# Altium PCB video.altium-saved.PcbDoc (part 1 of 5)
Units mil, origin at the board's own origin, x right, y up, seen from the top; angles counter-clockwise.
Board outline 12285 x 4200 mil, 4 copper layers (top_copper, Mid-Layer 1, Mid-Layer 2, Bottom Layer), stack 68.6 mil thick; 189 components, 588 nets, 2118 pads, 808 vias.
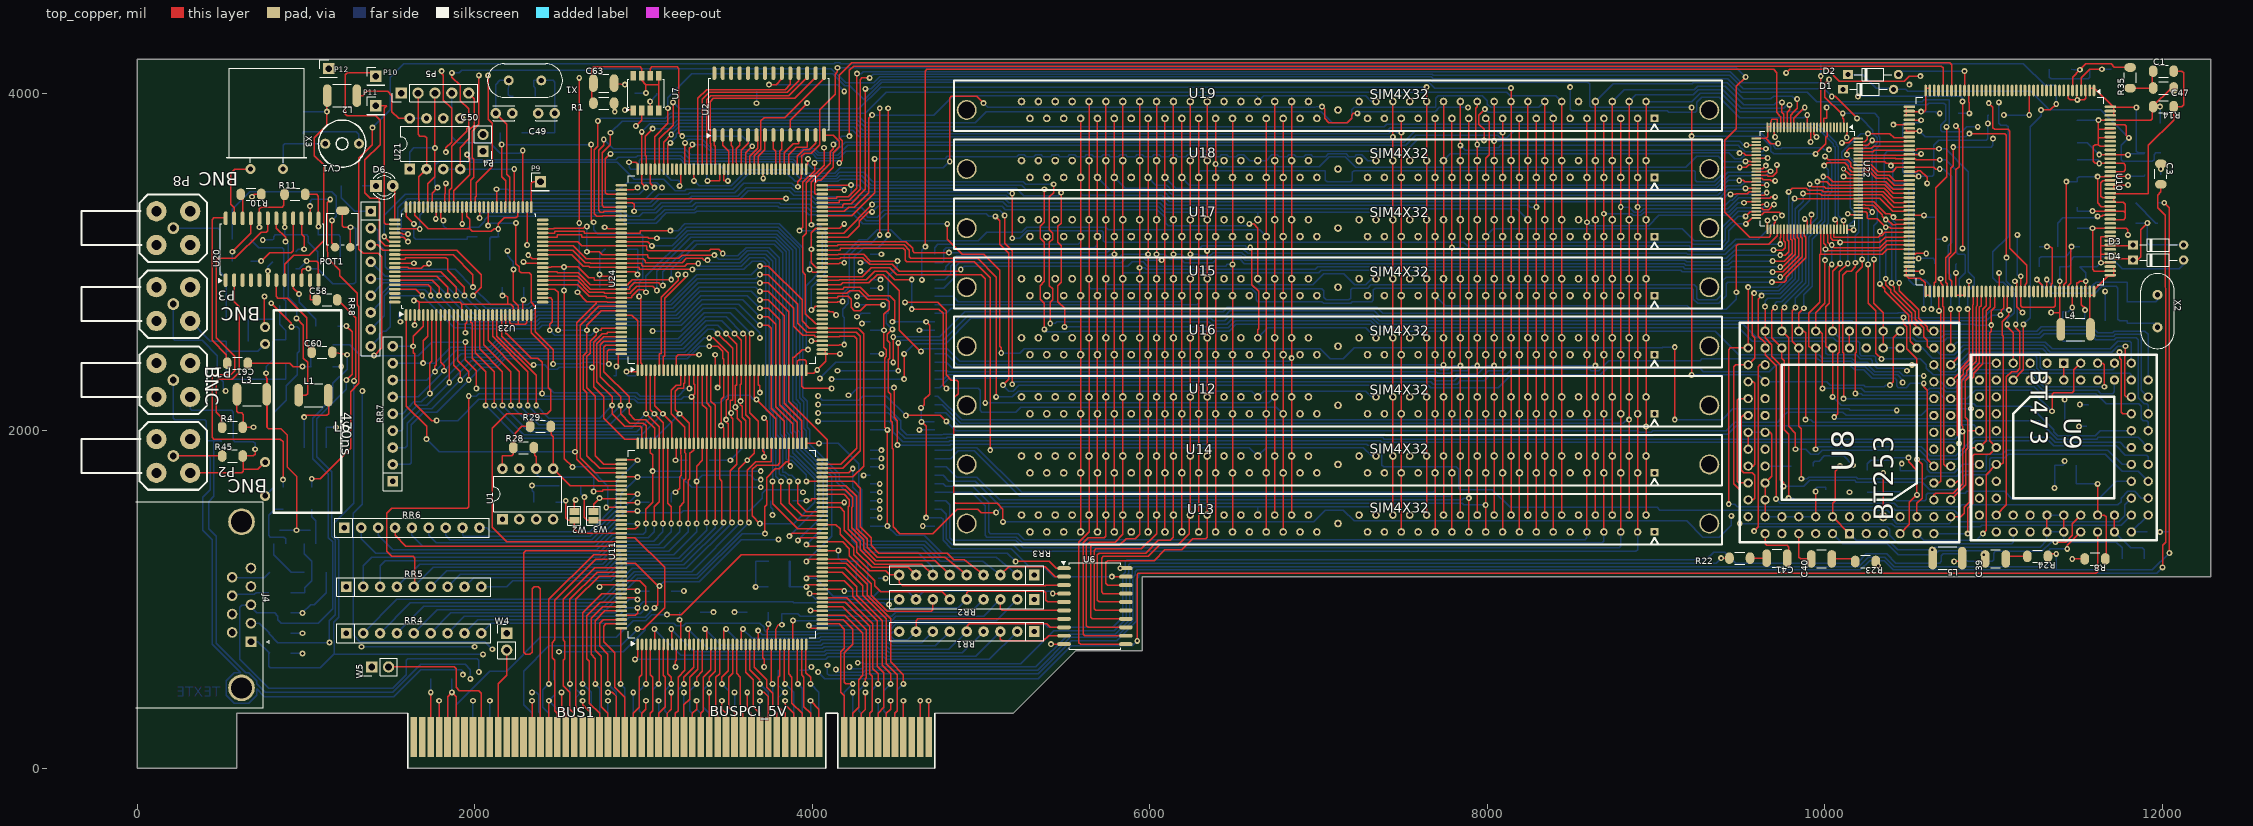
[diagram p0: top_copper view]
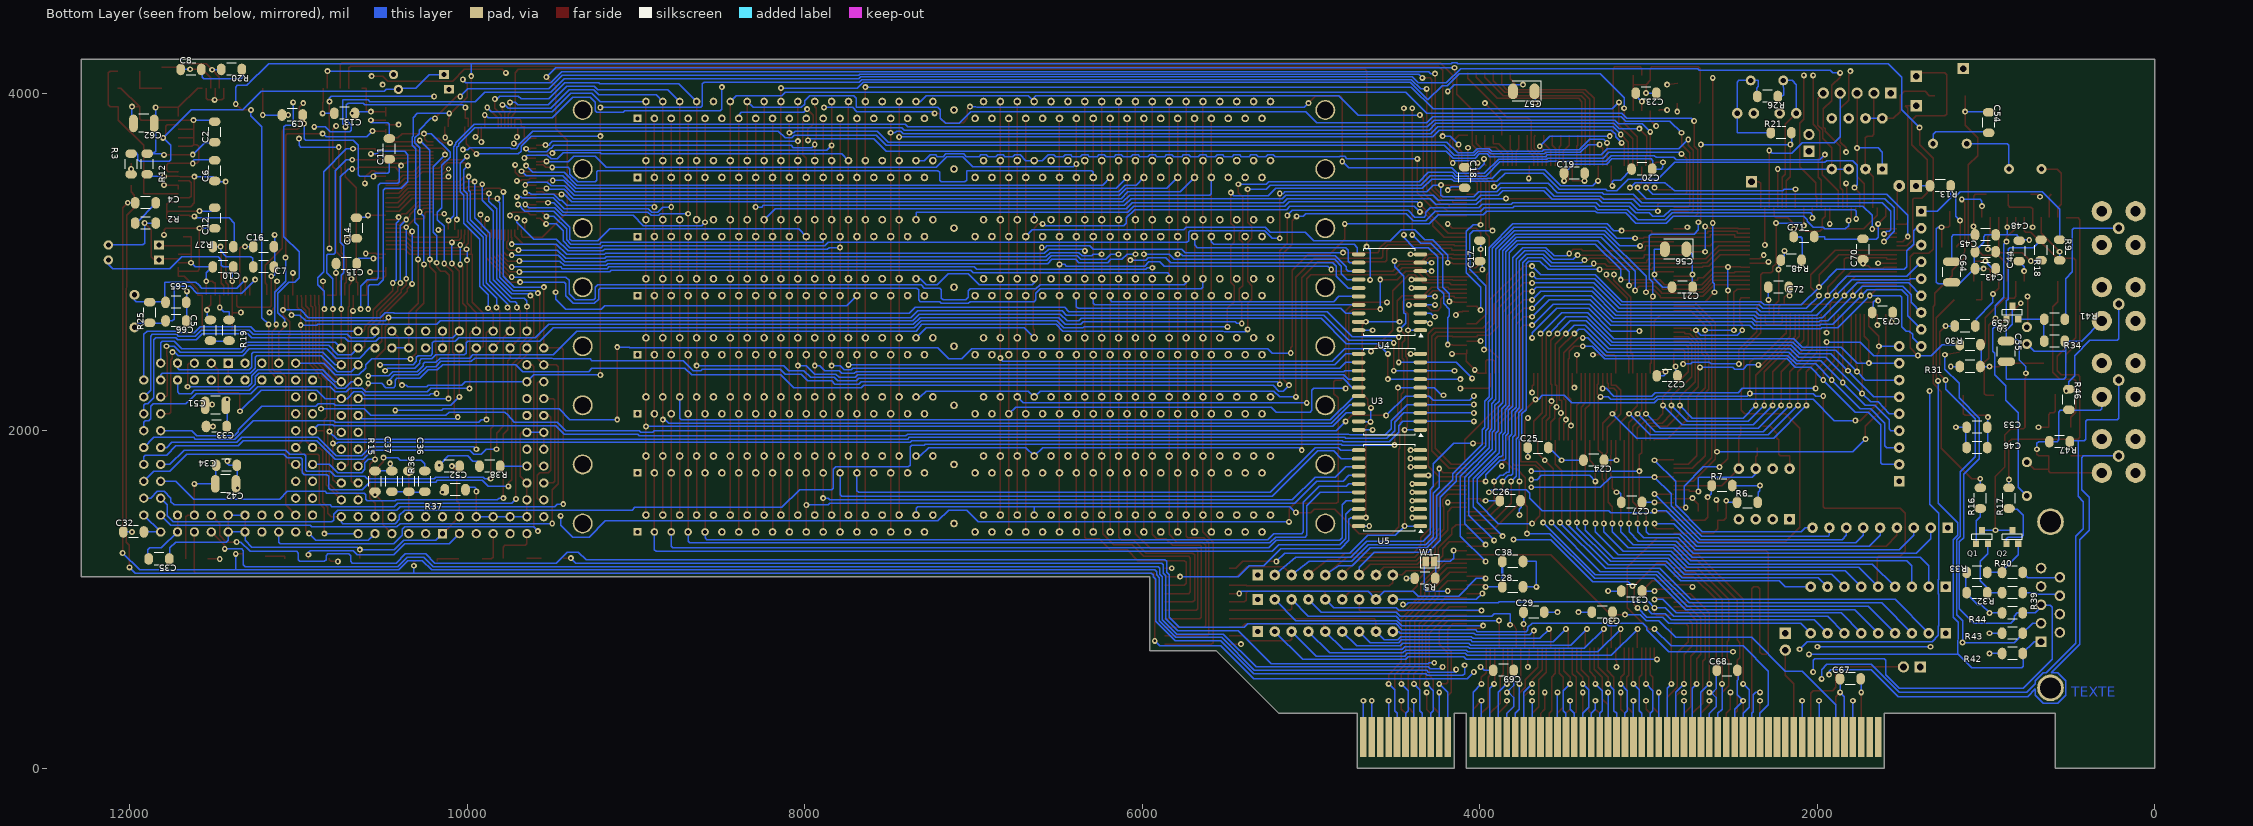
[diagram p1: Bottom Layer view, seen from below]
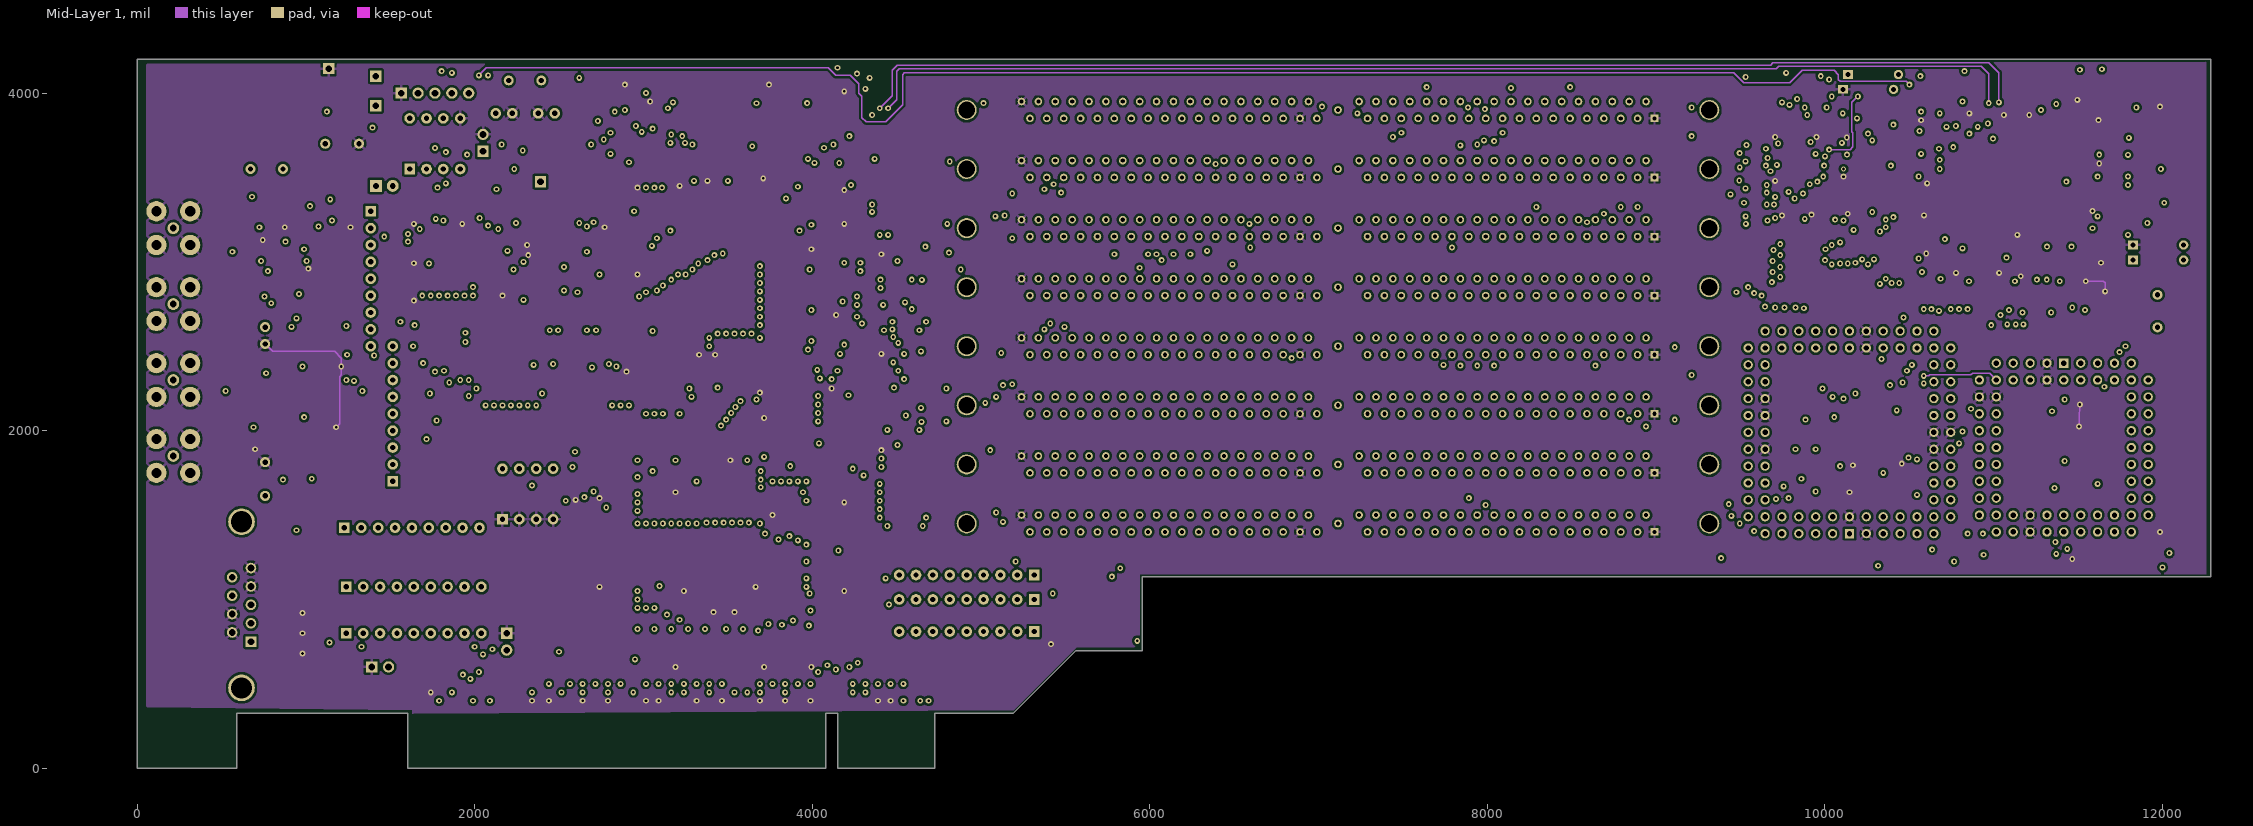
[diagram p2: Mid-Layer 1]
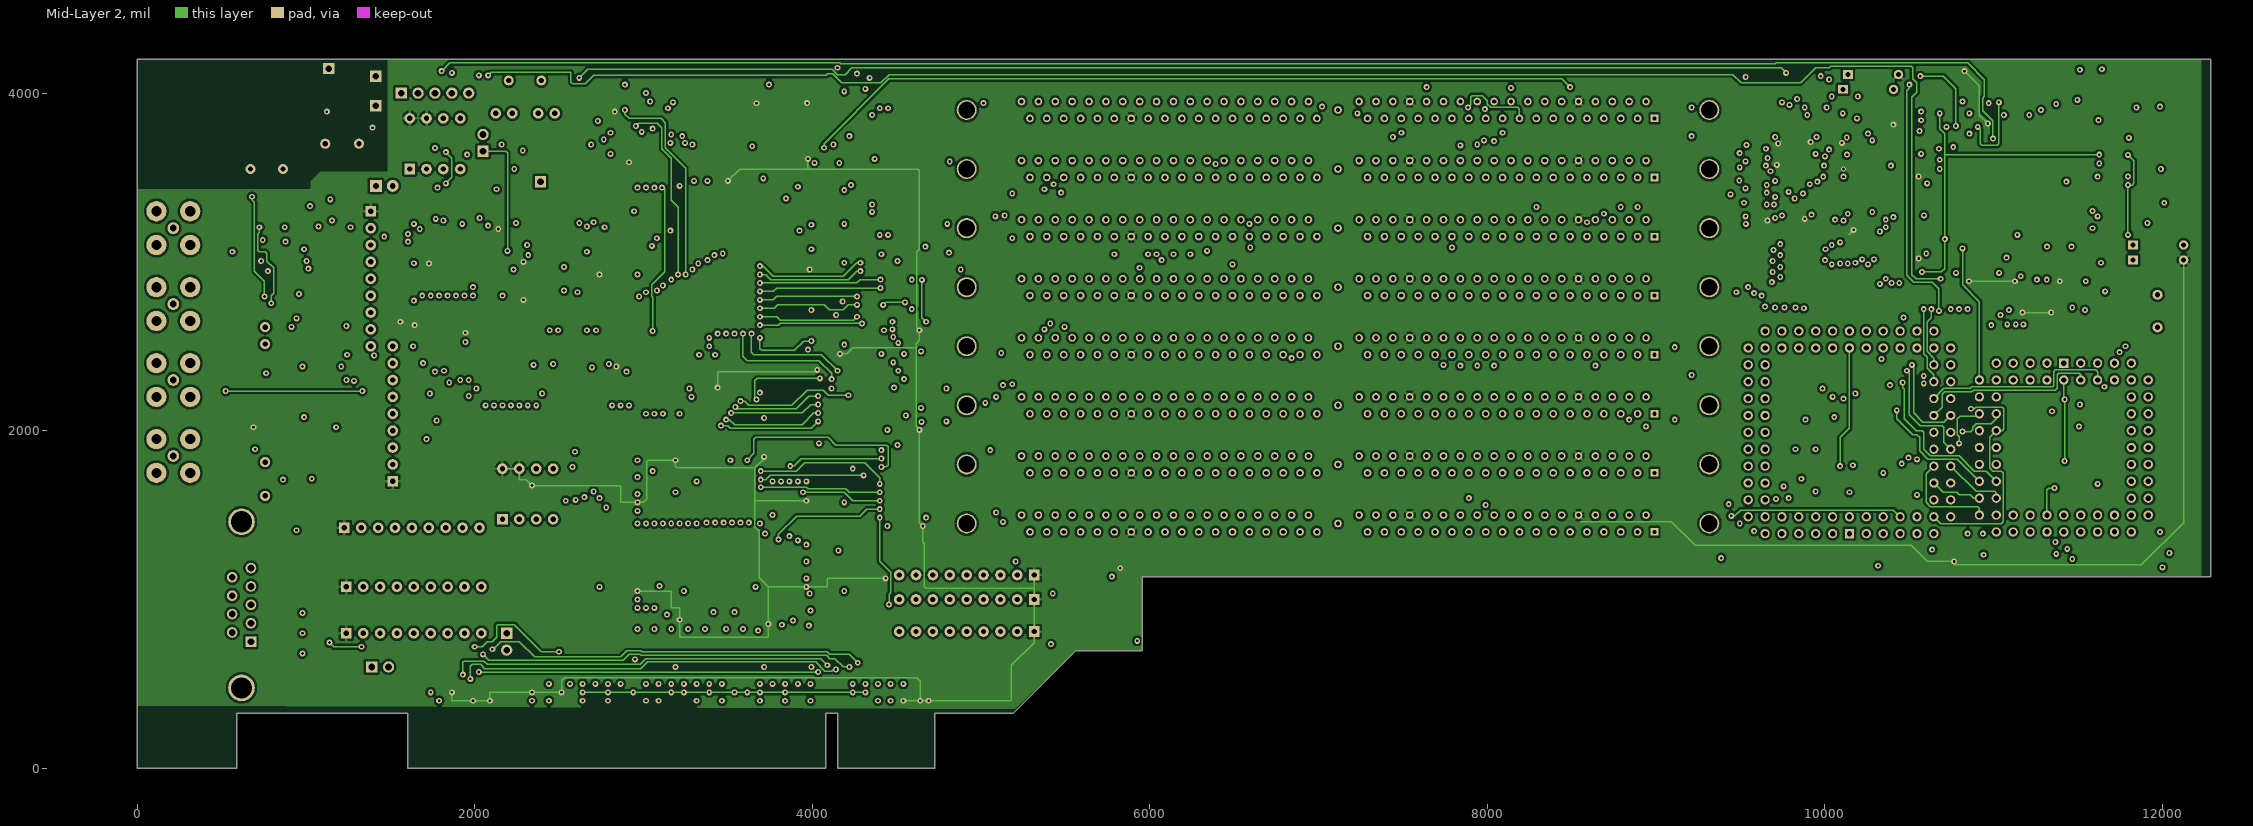
[diagram p3: Mid-Layer 2]

## Layer stack, top to bottom
Top Solder: solder mask 0.4, Solder Resist, Dk 3.5
top_copper: signal copper 1.4
Dielectric 1: core 21, FR-4, Dk 4.5
Mid-Layer 1: signal copper 1.4
Dielectric 2: prepreg 21, FR-4, Dk 4.5
Mid-Layer 2: signal copper 1.4
Dielectric 3: core 21, FR-4, Dk 4.5
Bottom Layer: signal copper 1.4
Bottom Solder: solder mask 0.4, Solder Resist, Dk 3.5

## Board outline
9345,1135 12085,1135 12285,1135 12285,4200 6715,4200 0,4200 0,0 590,0 590,325 1605,325 1605,0 4080,0 4080,325 4150,325 4150,0 4725,0 4725,325 5190,325 5560,695 5955,695 5955,1135 6395,1135

## Design rules (kind name [scope] priority, off if disabled: settings)
BoardOutlineClearance [All] p1: gap=0.39 ignorepadtopadclearanceinfootprint=FALSE
Clearance Clearance_pwr [InNetClass('pwr')] p1: gap=7.87 ignorepadtopadclearanceinfootprint=FALSE
Clearance "Clearance_Polygon 0" [InNamedPolygon('Polygon 0')] p2: gap=15.75 ignorepadtopadclearanceinfootprint=FALSE
Clearance "Clearance_Polygon 1" [InNamedPolygon('Polygon 1')] p3: gap=15.75 ignorepadtopadclearanceinfootprint=FALSE
Clearance [All] p4: gap=7.87 ignorepadtopadclearanceinfootprint=FALSE
DiffPairsRouting [All] p1: maxlimit=9.84 minlimit=9.84 mostfreqgap=9.84 toplayer_minwidth=15 toplayer_maxwidth=15 toplayer_prefwidth=7.87 midlayer1_minwidth=15 midlayer1_maxwidth=15 midlayer1_prefwidth=15 midlayer2_minwidth=15 midlayer2_maxwidth=15 midlayer2_prefwidth=15 bottomlayer_minwidth=15 bottomlayer_maxwidth=15 bottomlayer_prefwidth=15 maxuncoupledlength=500
HoleSize [All] p1: absolutevalues=TRUE maxlimit=125.98 minlimit=15.75 maxpercent=80.000 minpercent=20.000
HoleToHoleClearance [All] p1: gap=9.84 allowstackedmicrovias=FALSE
MinimumAnnularRing [All] p1: minimumring=1.97
PolygonConnect "PolygonConnect_Polygon 0" [InNamedPolygon('Polygon 0')] p1: connectstyle=Relief reliefconductorwidth=11.81 reliefentries=4 polygonreliefangle="90 Angle" airgapwidth=15.75
PolygonConnect "PolygonConnect_Polygon 1" [InNamedPolygon('Polygon 1')] p2: connectstyle=Relief reliefconductorwidth=11.81 reliefentries=4 polygonreliefangle="90 Angle" airgapwidth=15.75
PolygonConnect [All] p3: connectstyle=Relief reliefconductorwidth=19.68 reliefentries=4 polygonreliefangle="90 Angle" airgapwidth=19.68
RoutingVias RoutingVias_pwr [InNetClass('pwr')] p1: holewidth=15.75 width=31.5 viastyle="Through Hole" minholewidth=15.75 minwidth=31.5 maxholewidth=15.75 maxwidth=35
RoutingVias [All] p2: holewidth=15.75 width=35 viastyle="Through Hole" minholewidth=15.75 minwidth=31.5 maxholewidth=15.75 maxwidth=35
SilkToSilkClearance [All] p1: silktosilkclearance=0
SolderMaskExpansion [All] p1: expansion=0 istentingtop=FALSE
Width Width_pwr [InNetClass('pwr')] p1: maxlimit=10 minlimit=7.87 preferedwidth=9.84
Width [All] p2: maxlimit=10 minlimit=7.87 preferedwidth=7.87
26 further rules are at their usual default settings.

## Classes and differential pairs
net class pwr: +3.3V +5F

## Components (designator, comment, footprint, x,y, rotation, side; value= is the part's Value field where it differs from the comment)
BUS1 "BUSPCI_5V" BUSPCI 4115,175 r0 top locked
C1 "100nF" R_1206_3216Metric_Pad1.30x1.75mm_HandSolder 12005,4130 r0 top
C2 "100nF" R_1206_3216Metric_Pad1.30x1.75mm_HandSolder 11495,3770 r90 bottom
C3 "100nF" R_1206_3216Metric_Pad1.30x1.75mm_HandSolder 11990,3520 r270 top
C4 "100nF" R_1206_3216Metric_Pad1.30x1.75mm_HandSolder 11905,3350 r0 bottom
C5 "100nF" R_1206_3216Metric_Pad1.30x1.75mm_HandSolder 11520,2595 r270 bottom
C6 "100nF" R_1206_3216Metric_Pad1.30x1.75mm_HandSolder 11495,3540 r90 bottom
C7 "100nF" R_1206_3216Metric_Pad1.30x1.75mm_HandSolder 11205,2970 r180 bottom
C8 "100nF" R_1206_3216Metric_Pad1.30x1.75mm_HandSolder 11635,4140 r180 bottom
C9 "100nF" R_1206_3216Metric_Pad1.30x1.75mm_HandSolder 11035,3870 r0 bottom
C10 "100nF" R_1206_3216Metric_Pad1.30x1.75mm_HandSolder 11445,2970 r0 bottom
C11 "100nF" R_1206_3216Metric_Pad1.30x1.75mm_HandSolder 10460,3670 r90 bottom
C12 "100nF" R_1206_3216Metric_Pad1.30x1.75mm_HandSolder 11495,3260 r90 bottom
C13 "100nF" R_1206_3216Metric_Pad1.30x1.75mm_HandSolder 10725,3880 r0 bottom
C14 "100nF" R_1206_3216Metric_Pad1.30x1.75mm_HandSolder 10655,3200 r90 bottom
C15 "100nF" R_1206_3216Metric_Pad1.30x1.75mm_HandSolder 10715,2990 r0 bottom
C16 "100nF" R_1206_3216Metric_Pad1.30x1.75mm_HandSolder 11205,3090 r180 bottom
C17 "100nF" R_1206_3216Metric_Pad1.30x1.75mm_HandSolder 4000,3065 r90 bottom
C18 "100nF" R_1206_3216Metric_Pad1.30x1.75mm_HandSolder 4090,3500 r270 bottom
C19 "100nF" R_1206_3216Metric_Pad1.30x1.75mm_HandSolder 3440,3525 r180 bottom
C20 "100nF" R_1206_3216Metric_Pad1.30x1.75mm_HandSolder 3040,3550 r0 bottom
C21 "100nF" R_1206_3216Metric_Pad1.30x1.75mm_HandSolder 2800,2850 r0 bottom
C22 "100nF" R_1206_3216Metric_Pad1.30x1.75mm_HandSolder 2890,2325 r0 bottom
C23 "100nF" R_1206_3216Metric_Pad1.30x1.75mm_HandSolder 3015,4000 r0 bottom
C24 "100nF" R_1206_3216Metric_Pad1.30x1.75mm_HandSolder 3325,1825 r0 bottom
C25 "100nF" R_1206_3216Metric_Pad1.30x1.75mm_HandSolder 3655,1900 r180 bottom
C26 "100nF" R_1206_3216Metric_Pad1.30x1.75mm_HandSolder 3820,1585 r180 bottom
C27 "100nF" R_1206_3216Metric_Pad1.30x1.75mm_HandSolder 3100,1575 r0 bottom
C28 "100nF" R_1206_3216Metric_Pad1.30x1.75mm_HandSolder 3805,1075 r180 bottom
C29 "100nF" R_1206_3216Metric_Pad1.30x1.75mm_HandSolder 3680,925 r180 bottom
C30 "100nF" R_1206_3216Metric_Pad1.30x1.75mm_HandSolder 3275,925 r0 bottom
C31 "100nF" R_1206_3216Metric_Pad1.30x1.75mm_HandSolder 3100,1050 r0 bottom
C32 "100nF" R_1206_3216Metric_Pad1.30x1.75mm_HandSolder 11975,1400 r180 bottom
C33 "100nF" R_1206_3216Metric_Pad1.30x1.75mm_HandSolder 11485,2025 r0 bottom
C34 "100nF" R_1206_3216Metric_Pad1.30x1.75mm_HandSolder 11425,1795 r0 bottom
C35 "100nF" R_1206_3216Metric_Pad1.30x1.75mm_HandSolder 11825,1240 r0 bottom
C36 "100nF" R_1206_3216Metric_Pad1.30x1.75mm_HandSolder 10250,1700 r270 bottom
C37 "100pF" R_1206_3216Metric_Pad1.30x1.75mm_HandSolder 10445.12,1700 r270 bottom
C38 "4,7uF" R_1206_3216Metric_Pad1.30x1.75mm_HandSolder 3805,1225 r180 bottom
C39 "1uF" R_1210_3225Metric_Pad1.30x2.65mm_HandSolder 11010,1240 r0 top
C40 "1uF" R_1210_3225Metric_Pad1.30x2.65mm_HandSolder 9980,1240 r0 top
C41 "1uF" R_1210_3225Metric_Pad1.30x2.65mm_HandSolder 9715,1245 r180 top
C42 "2.2uF" R_1210_3225Metric_Pad1.30x2.65mm_HandSolder 11430,1685 r0 bottom
C43 "220nF" R_1206_3216Metric_Pad1.30x1.75mm_HandSolder 1005,2960 r0 bottom
C44 "220nF" R_1206_3216Metric_Pad1.30x1.75mm_HandSolder 805,3065 r90 bottom
C45 "220nF" R_1206_3216Metric_Pad1.30x1.75mm_HandSolder 1005,3060 r0 bottom
C46 "220pF" R_1206_3216Metric_Pad1.30x1.75mm_HandSolder 1055,1900 r0 bottom
C47 "220pF" R_1206_3216Metric_Pad1.30x1.75mm_HandSolder 12005,4030 r0 top
C48 "22nF" R_1206_3216Metric_Pad1.30x1.75mm_HandSolder 1005,3160 r0 bottom
C49 "22pF" C_Disc_D3.0mm_W2.0mm_P2.50mm 2475,3880 r180 top
C50 "22pF" C_Disc_D3.0mm_W2.0mm_P2.50mm 2125,3880 r0 top
C51 "22uF" R_1210_3225Metric_Pad1.30x2.65mm_HandSolder 11490,2150 r0 bottom
C52 "22uF" R_1206_3216Metric_Pad1.30x1.75mm_HandSolder 10105,1790 r0 bottom
C53 "330pF" R_1206_3216Metric_Pad1.30x1.75mm_HandSolder 1055,2020 r0 bottom
C54 "4.7uF" R_1206_3216Metric_Pad1.30x1.75mm_HandSolder 985,3825 r270 bottom
C55 "4.7uF" R_1210_3225Metric_Pad1.30x2.65mm_HandSolder 880,2470 r270 bottom
C56 "4.7uF" CP_EIA-3528-21_Kemet-B_Pad1.50x2.35mm_HandSolder 2840,3075 r0 bottom
C57 "4.7uF" CP_EIA-3528-21_Kemet-B_Pad1.50x2.35mm_HandSolder 3740,4010 r0 bottom
C58 "47nF" R_1206_3216Metric_Pad1.30x1.75mm_HandSolder 1125,2775 r0 top
C59 "47nF" R_1206_3216Metric_Pad1.30x1.75mm_HandSolder 1125,2620 r0 bottom
C60 "47nF" R_1206_3216Metric_Pad1.30x1.75mm_HandSolder 1095.98,2464 r0 top
C61 "47nF" R_1206_3216Metric_Pad1.30x1.75mm_HandSolder 595,2400 r180 top
C62 "47uF" R_1210_3225Metric_Pad1.30x2.65mm_HandSolder 11915,3820 r0 bottom
C63 "47uF" R_1210_3225Metric_Pad1.30x2.65mm_HandSolder 2765,4059.15 r0 top
C64 "6,8uF" R_1210_3225Metric_Pad1.30x2.65mm_HandSolder 1205,2940 r270 bottom
C65 "22pF" R_1206_3216Metric_Pad1.30x1.75mm_HandSolder 11725,2760 r0 bottom
C66 "22pF" R_1206_3216Metric_Pad1.30x1.75mm_HandSolder 11725,2650 r0 bottom
C67 "4,7uF" R_1206_3216Metric_Pad1.30x1.75mm_HandSolder 1805,530 r180 bottom
C68 "4,7uF" R_1206_3216Metric_Pad1.30x1.75mm_HandSolder 2535,580 r180 bottom
C69 "4,7uF" R_1206_3216Metric_Pad1.30x1.75mm_HandSolder 3860,580 r0 bottom
C70 "100nF" R_1206_3216Metric_Pad1.30x1.75mm_HandSolder 1730,3075 r90 bottom
C71 "100nF" R_1206_3216Metric_Pad1.30x1.75mm_HandSolder 2080,3150 r180 bottom
C72 "100nF" R_1206_3216Metric_Pad1.30x1.75mm_HandSolder 2230,2850 r180 bottom
C73 "100nF" R_1206_3216Metric_Pad1.30x1.75mm_HandSolder 1615,2700 r0 bottom
CV1 "5/30pF" CV3-30PF 1215,3700 r180 top
D1 "BAT46" D_DO-34_SOD68_P7.62mm_Horizontal 10106.54,4021.88 r0 top
D2 "BAT46" D_DO-34_SOD68_P7.62mm_Horizontal 10135,4110 r0 top
D3 "BAT46" D_DO-34_SOD68_P7.62mm_Horizontal 11825,3100 r0 top
D4 "BAT46" D_DO-34_SOD68_P7.62mm_Horizontal 11825,3010.86 r0 top
D6 "LED" LED_D3.0mm 1415,3450 r0 top
J4 "DB9FEM" DSUB-9_Female_Horizontal_P2.77x2.84mm_EdgePinOffset14.56mm_Housed_MountingHolesOffset15.98mm 675,750 r270 top locked
L1 "2,2uH" R_1812_4532Metric_Pad1.30x3.40mm_HandSolder 1045,2210 r0 top
L2 "22uH" R_1812_4532Metric_Pad1.30x3.40mm_HandSolder 1215,3985 r180 top
L3 "22uH" R_1812_4532Metric_Pad1.30x3.40mm_HandSolder 680,2215 r0 top
L4 "22uF" R_1812_4532Metric_Pad1.30x3.40mm_HandSolder 11485,2600 r0 top
L5 "22uH" R_1812_4532Metric_Pad1.30x3.40mm_HandSolder 10725,1245 r180 top
L6 "470ns" LRTDK 759.05,2113.74 r270 top
P1 "BNC" subclick 215,2300 r180 top locked
P2 "BNC" subclick 215,1850 r180 top locked
P3 "BNC" subclick 215,2750 r180 top locked
P4 "CONN_2" PinHeader_1x02_P2.54mm_Vertical 2050,3655 r180 top
P5 "CONN_5" PinHeader_1x05_P2.54mm_Vertical 1565,4000 r90 top
P8 "BNC" subclick 215,3200 r180 top locked
P9 "CONN_1" PinHeader_1x01_P2.54mm_Vertical 2390,3475 r0 top
P10 "CONN_1" PinHeader_1x01_P2.54mm_Vertical 1415,4100 r0 top
P11 "CONN_1" PinHeader_1x01_P2.54mm_Vertical 1415,3925 r0 top
P12 "CONN_1" PinHeader_1x01_P2.54mm_Vertical 1135,4145 r0 top
POT1 "100K" Potentiometer_Bourns_3314G_Vertical 1218.34,3195 r180 top
Q1 "BC848" SOT23EBC 1025,1370 r0 bottom
Q2 "BC848" SOT23EBC 845,1370 r0 bottom
Q3 "BC848" SOT23EBC 845,2700 r0 bottom
R1 "10" R_1206_3216Metric_Pad1.30x1.75mm_HandSolder 2765,3940 r0 top
R2 "100" R_1206_3216Metric_Pad1.30x1.75mm_HandSolder 11905,3230 r0 bottom
R3 "100" R_1206_3216Metric_Pad1.30x1.75mm_HandSolder 11990,3580 r270 bottom
R4 "10K" R_1206_3216Metric_Pad1.30x1.75mm_HandSolder 565,2020 r0 top
R5 "10K" R_1206_3216Metric_Pad1.30x1.75mm_HandSolder 4325,1125 r0 bottom
R6 "10K" R_1206_3216Metric_Pad1.30x1.75mm_HandSolder 2415,1575 r180 bottom
R7 "10K" R_1206_3216Metric_Pad1.30x1.75mm_HandSolder 2565,1675 r180 bottom
R8 "150" R_1206_3216Metric_Pad1.30x1.75mm_HandSolder 11600,1240 r180 top
R9 "150K" R_1206_3216Metric_Pad1.30x1.75mm_HandSolder 565,3070 r270 bottom
R10 "1K" R_1206_3216Metric_Pad1.30x1.75mm_HandSolder 675,3400 r180 top
R11 "1K" R_1206_3216Metric_Pad1.30x1.75mm_HandSolder 935,3400 r0 top
R12 "1K" R_1206_3216Metric_Pad1.30x1.75mm_HandSolder 11895,3580 r90 bottom
R13 "1K" R_1206_3216Metric_Pad1.30x1.75mm_HandSolder 1271.7,3450.94 r0 bottom
R14 "1M" R_1206_3216Metric_Pad1.30x1.75mm_HandSolder 12005,3920 r180 top
R15 "1M" R_1206_3216Metric_Pad1.30x1.75mm_HandSolder 10545,1700 r270 bottom
R16 "220" R_1206_3216Metric_Pad1.30x1.75mm_HandSolder 1035,1600 r90 bottom
R17 "220" R_1206_3216Metric_Pad1.30x1.75mm_HandSolder 865,1600 r90 bottom
R18 "220" R_1206_3216Metric_Pad1.30x1.75mm_HandSolder 675,3070 r270 bottom
R19 "220" R_1206_3216Metric_Pad1.30x1.75mm_HandSolder 11410,2595 r90 bottom
R20 "220" R_1206_3216Metric_Pad1.30x1.75mm_HandSolder 11395,4140 r0 bottom
R21 "220" R_1206_3216Metric_Pad1.30x1.75mm_HandSolder 2215,3765 r180 bottom
R22 "220" R_1206_3216Metric_Pad1.30x1.75mm_HandSolder 9495,1245 r0 top
R23 "220" R_1206_3216Metric_Pad1.30x1.75mm_HandSolder 10240,1225 r180 top
R24 "220" R_1206_3216Metric_Pad1.30x1.75mm_HandSolder 11260,1255 r180 top
R25 "220K" R_1206_3216Metric_Pad1.30x1.75mm_HandSolder 11880,2700 r90 bottom
R26 "220K" R_1206_3216Metric_Pad1.30x1.75mm_HandSolder 2295,3980 r0 bottom
R27 "27K" R_1206_3216Metric_Pad1.30x1.75mm_HandSolder 11445,3090 r0 bottom
R28 "2,2K" R_1206_3216Metric_Pad1.30x1.75mm_HandSolder 2290,1900 r0 top
R29 "2,2K" R_1206_3216Metric_Pad1.30x1.75mm_HandSolder 2390,2025 r0 top
R30 "3,3K" R_1206_3216Metric_Pad1.30x1.75mm_HandSolder 1095,2510 r0 bottom
R31 "470" R_1206_3216Metric_Pad1.30x1.75mm_HandSolder 1095,2380 r180 bottom
R32 "470" R_1206_3216Metric_Pad1.30x1.75mm_HandSolder 1055,1040 r0 bottom
R33 "470" R_1206_3216Metric_Pad1.30x1.75mm_HandSolder 1055,1160 r0 bottom
R34 "470" R_1206_3216Metric_Pad1.30x1.75mm_HandSolder 595,2530 r180 bottom
R35 "470" R_1206_3216Metric_Pad1.30x1.75mm_HandSolder 11807.32,4090.65 r90 top
R36 "470" R_1206_3216Metric_Pad1.30x1.75mm_HandSolder 10345,1700 r90 bottom
R37 "510" R_1206_3216Metric_Pad1.30x1.75mm_HandSolder 10070,1650 r180 bottom
R38 "510" R_1206_3216Metric_Pad1.30x1.75mm_HandSolder 9865,1790 r0 bottom
R39 "68" R_1206_3216Metric_Pad1.30x1.75mm_HandSolder 845,1040 r0 bottom
R40 "68" R_1206_3216Metric_Pad1.30x1.75mm_HandSolder 845,1160 r180 bottom
R41 "68" R_1206_3216Metric_Pad1.30x1.75mm_HandSolder 595,2660 r0 bottom
R42 "75" R_1206_3216Metric_Pad1.30x1.75mm_HandSolder 845,680 r180 bottom
R43 "75" R_1206_3216Metric_Pad1.30x1.75mm_HandSolder 845,800 r180 bottom
R44 "75" R_1206_3216Metric_Pad1.30x1.75mm_HandSolder 845,920 r180 bottom
R45 "75" R_1206_3216Metric_Pad1.30x1.75mm_HandSolder 565,1850 r0 top
R46 "75" R_1206_3216Metric_Pad1.30x1.75mm_HandSolder 510,2185 r270 bottom
R47 "75" R_1206_3216Metric_Pad1.30x1.75mm_HandSolder 565,1935 r0 bottom
R48 "10K" R_1206_3216Metric_Pad1.30x1.75mm_HandSolder 2155,3010 r0 bottom
RR1 "8x10K" R_Array_SIP9 5315,810 r180 top
RR2 "8x10K" R_Array_SIP9 5315,1000 r180 top
RR3 "8x10K" R_Array_SIP9 5315,1145 r180 top
RR4 "8x10K" R_Array_SIP9 1240,800 r0 top
RR5 "8x10K" R_Array_SIP9 1240,1075 r0 top
RR6 "8x10K" R_Array_SIP9 1228.58,1425 r0 top
RR7 "8x10K" R_Array_SIP9 1515,1700 r90 top
RR8 "8x10K" R_Array_SIP9 1385,3300 r270 top
U1 "24C16" DIP-8_W7.62mm 2165,1475 r90 top
U2 "4C4001" SOIC-28W_7.5x17.9mm_P1.27mm 3745,3935 r90 top
U3 "74LS245" SOIC-20W_7.5x12.8mm_P1.27mm 4535,2230 r0 bottom
U4 "74LS245" SOIC-20W_7.5x12.8mm_P1.27mm 4535,2820 r0 bottom
U5 "74LS245" SOIC-20W_7.5x12.8mm_P1.27mm 4535,1660 r0 bottom
U6 "74LS245" SOIC-20W_7.5x12.8mm_P1.27mm 5675,960 r0 top
U7 "AV9173" SSOP-8_3.95x5.21x3.27mm_P1.27mm 3015,4000 r90 top
U8 "BT253" PLCC84 10145,1990 r90 top
U9 "BT473" PLCC68 11415,1900 r270 top
U10 "BT812" PQFP-160_28x28mm_P0.65mm 11095,3420 r270 top
U11 "S5933_PQ160" PQFP-160_28x28mm_P0.65mm 3465,1328.94 r90 top
U12 "SIM4X32" sim72 7115,2150 r0 top
U13 "SIM4X32" sim72 7115,1450 r0 top
U14 "SIM4X32" sim72 7115,1800 r0 top
U15 "SIM4X32" sim72 7115,2850 r0 top
U16 "SIM4X32" sim72 7115,2500 r0 top
U17 "SIM4X32" sim72 7115,3200 r0 top
U18 "SIM4X32" sim72 7115,3550 r0 top
U19 "SIM4X32" sim72 7115,3900 r0 top
U20 "TDA8501" SOIC-24W_7.5x15.4mm_P1.27mm 800,3075 r90 top
U21 "XC1736APD8" DIP-8_W7.62mm 1615,3550 r90 top
U22 "XC4003-VQ100" TQFP-100_14x14mm_P0.5mm 9895,3495 r270 top
U23 "XC4003/PQ100" PQFP-100_14x20mm_P0.65mm 1965,3005 r90 top
U24 "XC4005-PQ160" PQFP-160_28x28mm_P0.65mm 3465,2953.94 r90 top
W1 "16/32" SolderJumper-2_P1.3mm_Open_Pad1.0x1.5mm 4295,1225 r180 bottom
W2 "FLOAT#" SolderJumper-2_P1.3mm_Open_Pad1.0x1.5mm 2590.79,1495.87 r270 top
W3 "SERNV" SolderJumper-2_P1.3mm_Open_Pad1.0x1.5mm 2704.96,1495.87 r270 top
W4 "TEST" PinHeader_1x02_P2.54mm_Vertical 2190,800 r0 top
W5 "TEST" PinHeader_1x02_P2.54mm_Vertical 1390,600 r90 top
X1 "10MHz" Crystal_HC18-U_Vertical 2395,4075 r180 top
X2 "30MHz" Crystal_HC18-U_Vertical 11970,2805 r270 top
X3 "4.433618MHz" Crystal_HC18-U_Horizontal 865,3550 r180 top

## Footprints (in the part's own frame and the unit in brackets; to place one, negate y for a bottom-side part, rotate by r counter-clockwise, add the part's x,y. Pads: shape width x height; smd on the part's side, far side on the other; paste and mask are expansions set on the pad)
BUSPCI [mil]
  rect 40x236.22 smd far side paste-236.22: A1(-2475,10) A2(-2425,10) A3(-2375,10) A4(-2325,10) A5(-2275,10) A6(-2225,10) A7(-2175,10) A8(-2125,10) A9(-2075,10) A10(-2025,10) A11(-1975,10) A12(-1925,10) A13(-1875,10) A14(-1825,10) A15(-1775,10) A16(-1725,10) A17(-1675,10) A18(-1625,10) A19(-1575,10) A20(-1525,10) A21(-1475,10) A22(-1425,10) A23(-1375,10) A24(-1325,10) A25(-1275,10) A26(-1225,10) A27(-1175,10) A28(-1125,10) A29(-1075,10) A30(-1025,10) A31(-975,10) A32(-925,10) A33(-875,10) A34(-825,10) A35(-775,10) A36(-725,10) A37(-675,10) A38(-625,10) A39(-575,10) A40(-525,10) A41(-475,10) A42(-425,10) A43(-375,10) A44(-325,10) A45(-275,10) A46(-225,10) A47(-175,10) A48(-125,10) A49(-75,10) A52(75,10) A53(125,10) A54(175,10) A55(225,10) A56(275,10) A57(325,10) A58(375,10) A59(425,10) A60(475,10) A61(525,10) A62(575,10)
  rect 40x236.22 smd paste-236.22: B1(-2475,10) B2(-2425,10) B3(-2375,10) B4(-2325,10) B5(-2275,10) B6(-2225,10) B7(-2175,10) B8(-2125,10) B9(-2075,10) B10(-2025,10) B11(-1975,10) B12(-1925,10) B13(-1875,10) B14(-1825,10) B15(-1775,10) B16(-1725,10) B17(-1675,10) B18(-1625,10) B19(-1575,10) B20(-1525,10) B21(-1475,10) B22(-1425,10) B23(-1375,10) B24(-1325,10) B25(-1275,10) B26(-1225,10) B27(-1175,10) B28(-1125,10) B29(-1075,10) B30(-1025,10) B31(-975,10) B32(-925,10) B33(-875,10) B34(-825,10) B35(-775,10) B36(-725,10) B37(-675,10) B38(-625,10) B39(-575,10) B40(-525,10) B41(-475,10) B42(-425,10) B43(-375,10) B44(-325,10) B45(-275,10) B46(-225,10) B47(-175,10) B48(-125,10) B49(-75,10) B52(75,10) B53(125,10) B54(175,10) B55(225,10) B56(275,10) B57(325,10) B58(375,10) B59(425,10) B60(475,10) B61(525,10) B62(575,10)
  silkscreen extent -2510,-175 610,150
C_Disc_D3.0mm_W2.0mm_P2.50mm [mm]
  round 1.6 hole 0.8: 1(0,0) 2(2.5,0)
  silkscreen extent -0.37,-1.12 2.87,1.12
CP_EIA-3528-21_Kemet-B_Pad1.50x2.35mm_HandSolder [mm]
  oval 1.5x2.35 smd: 1(-1.625,0) 2(1.625,0)
  silkscreen extent -2.64,-1.51 1.75,1.51
Crystal_HC18-U_Horizontal [mm]
  round 1.5 hole 0.8: 1(0,0) 2(4.9,0)
  silkscreen extent -3.55,-15.2 8.45,-0.95
Crystal_HC18-U_Vertical [mm]
  round 1.5 hole 0.8: 1(0,0) 2(4.9,0)
  silkscreen extent -3.2,-2.52 8.1,2.53
CV3-30PF [mil]
  round 60 hole 32: 1(100,0) 2(-100,0)
  silkscreen extent -140,-140 140,140
D_DO-34_SOD68_P7.62mm_Horizontal [mm]
  rect 1.5x1.3 hole 0.75: 1(0,0)
  round 1.4 hole 0.75: 2(7.62,0)
  silkscreen extent 0.99,-0.92 6.63,0.92
DIP-8_W7.62mm [mm]
  rect 1.6x1.6 hole 0.8: 1(0,0)
  round 1.6 hole 0.8: 2(0,-2.54) 3(0,-5.08) 4(0,-7.62) 5(7.62,-7.62) 6(7.62,-5.08) 7(7.62,-2.54) 8(7.62,0)
  silkscreen extent 1.16,-8.95 6.46,1.33
DSUB-9_Female_Horizontal_P2.77x2.84mm_EdgePinOffset14.56mm_Housed_MountingHolesOffset15.98mm [mm]
  round 4 hole 3.2: 0(-18.04,-1.42) 0(6.96,-1.42)
  rect 1.6x1.6 hole 1: 1(0,0)
  round 1.6 hole 1: 2(-2.77,0) 3(-5.54,0) 4(-8.31,0) 5(-11.08,0) 6(-1.385,-2.84) 7(-4.155,-2.84) 8(-6.925,-2.84) 9(-9.695,-2.84)
  silkscreen extent -21.02,-17.34 9.95,2.75
LED_D3.0mm [mm]
  rect 1.8x1.8 hole 0.9: 1(0,0)
  round 1.8 hole 0.9: 2(2.54,0)
  silkscreen extent -0.29,-1.99 2.94,1.99
LRTDK [mil]
  round 60 hole 32: 1(-500,0) 2(500,0) 3(-400,0) 3(300,0)
  silkscreen extent -600,50 600,450
PinHeader_1x01_P2.54mm_Vertical [mm]
  rect 1.7x1.7 hole 1: 1(0,0)
  silkscreen extent -1.33,-1.33 1.33,1.33
PinHeader_1x02_P2.54mm_Vertical [mm]
  rect 1.7x1.7 hole 1: 1(0,0)
  round 1.7 hole 1: 2(0,-2.54)
  silkscreen extent -1.33,-3.87 1.33,1.33
PinHeader_1x05_P2.54mm_Vertical [mm]
  rect 1.7x1.7 hole 1: 1(0,0)
  round 1.7 hole 1: 2(0,-2.54) 3(0,-5.08) 4(0,-7.62) 5(0,-10.16)
  silkscreen extent -1.33,-11.49 1.33,1.33
PLCC68 [mil]
  rect 55x55 hole 32: 1(-500,0)
  round 55 hole 32: 2(-400,0) 3(-500,-100) 4(-400,-100) 5(-500,-200) 6(-400,-200) 7(-500,-300) 8(-400,-300) 9(-500,-400) 10(-400,-500) 11(-400,-400) 12(-300,-500) 13(-300,-400) 14(-200,-500) 15(-200,-400) 16(-100,-500) 17(-100,-400) 18(0,-500) 19(0,-400) 20(100,-500) 21(100,-400) 22(200,-500) 23(200,-400) 24(300,-500) 25(300,-400) 26(400,-500) 27(500,-400) 28(400,-400) 29(500,-300) 30(400,-300) 31(500,-200) 32(400,-200) 33(500,-100) 34(400,-100) 35(500,0) 36(400,0) 37(500,100) 38(400,100) 39(500,200) 40(400,200) 41(500,300) 42(400,300) 43(500,400) 44(400,500) 45(400,400) 46(300,500) 47(300,400) 48(200,500) 49(200,400) 50(100,500) 51(100,400) 52(0,500) 53(0,400) 54(-100,500) 55(-100,400) 56(-200,500) 57(-200,400) 58(-300,500) 59(-300,400) 60(-400,500) 61(-500,400) 62(-400,400) 63(-500,300) 64(-400,300) 65(-500,200) 66(-400,200) 67(-500,100) 68(-400,100)
  silkscreen extent -550,-550 550,550
PLCC84 [mil]
  rect 55x55 hole 32: 1(-600,0)
  round 55 hole 32: 2(-500,0) 3(-600,-100) 4(-500,-100) 5(-600,-200) 6(-500,-200) 7(-600,-300) 8(-500,-300) 9(-600,-400) 10(-500,-400) 11(-600,-500) 12(-500,-600) 13(-500,-500) 14(-400,-600) 15(-400,-500) 16(-300,-600) 17(-300,-500) 18(-200,-600) 19(-200,-500) 20(-100,-600) 21(-100,-500) 22(0,-600) 23(0,-500) 24(100,-600) 25(100,-500) 26(200,-600) 27(200,-500) 28(300,-600) 29(300,-500) 30(400,-600) 31(400,-500) 32(500,-600) 33(600,-500) 34(500,-500) 35(600,-400) 36(500,-400) 37(600,-300) 38(500,-300) 39(600,-200) 40(500,-200) 41(600,-100) 42(500,-100) 43(600,0) 44(500,0) 45(600,100) 46(500,100) 47(600,200) 48(500,200) 49(600,300) 50(500,300) 51(600,400) 52(500,400) 53(600,500) 54(500,600) 55(500,500) 56(400,600) 57(400,500) 58(300,600) 59(300,500) 60(200,600) 61(200,500) 62(100,600) 63(100,500) 64(0,600) 65(0,500) 66(-100,600) 67(-100,500) 68(-200,600) 69(-200,500) 70(-300,600) 71(-300,500) 72(-400,600) 73(-400,500) 74(-500,600) 75(-600,500) 76(-500,500) 77(-600,400) 78(-500,400) 79(-600,300) 80(-500,300) 81(-600,200) 82(-500,200) 83(-600,100) 84(-500,100)
  silkscreen extent -650,-650 650,650
Potentiometer_Bourns_3314G_Vertical [mm]
  round 1.3 smd: 1(-1.15,2.75) 3(1.15,2.75)
  oval 2x1.3 smd: 2(0,-2.75)
  silkscreen extent -2.37,-2.37 2.37,2.37
PQFP-100_14x20mm_P0.65mm [mm]
  oval 1.75x0.4 smd: 1(-8.125,9.425) 2(-8.125,8.775) 3(-8.125,8.125) 4(-8.125,7.475) 5(-8.125,6.825) 6(-8.125,6.175) 7(-8.125,5.525) 8(-8.125,4.875) 9(-8.125,4.225) 10(-8.125,3.575) 11(-8.125,2.925) 12(-8.125,2.275) 13(-8.125,1.625) 14(-8.125,0.975) 15(-8.125,0.325) 16(-8.125,-0.325) 17(-8.125,-0.975) 18(-8.125,-1.625) 19(-8.125,-2.275) 20(-8.125,-2.925) 21(-8.125,-3.575) 22(-8.125,-4.225) 23(-8.125,-4.875) 24(-8.125,-5.525) 25(-8.125,-6.175) 26(-8.125,-6.825) 27(-8.125,-7.475) 28(-8.125,-8.125) 29(-8.125,-8.775) 30(-8.125,-9.425) 51(8.125,-9.425) 52(8.125,-8.775) 53(8.125,-8.125) 54(8.125,-7.475) 55(8.125,-6.825) 56(8.125,-6.175) 57(8.125,-5.525) 58(8.125,-4.875) 59(8.125,-4.225) 60(8.125,-3.575) 61(8.125,-2.925) 62(8.125,-2.275) 63(8.125,-1.625) 64(8.125,-0.975) 65(8.125,-0.325) 66(8.125,0.325) 67(8.125,0.975) 68(8.125,1.625) 69(8.125,2.275) 70(8.125,2.925) 71(8.125,3.575) 72(8.125,4.225) 73(8.125,4.875) 74(8.125,5.525) 75(8.125,6.175) 76(8.125,6.825) 77(8.125,7.475) 78(8.125,8.125) 79(8.125,8.775) 80(8.125,9.425)
  oval 0.4x1.75 smd: 31(-6.175,-11.125) 32(-5.525,-11.125) 33(-4.875,-11.125) 34(-4.225,-11.125) 35(-3.575,-11.125) 36(-2.925,-11.125) 37(-2.275,-11.125) 38(-1.625,-11.125) 39(-0.975,-11.125) 40(-0.325,-11.125) 41(0.325,-11.125) 42(0.975,-11.125) 43(1.625,-11.125) 44(2.275,-11.125) 45(2.925,-11.125) 46(3.575,-11.125) 47(4.225,-11.125) 48(4.875,-11.125) 49(5.525,-11.125) 50(6.175,-11.125) 81(6.175,11.125) 82(5.525,11.125) 83(4.875,11.125) 84(4.225,11.125) 85(3.575,11.125) 86(2.925,11.125) 87(2.275,11.125) 88(1.625,11.125) 89(0.975,11.125) 90(0.325,11.125) 91(-0.325,11.125) 92(-0.975,11.125) 93(-1.625,11.125) 94(-2.275,11.125) 95(-2.925,11.125) 96(-3.575,11.125) 97(-4.225,11.125) 98(-4.875,11.125) 99(-5.525,11.125) 100(-6.175,11.125)
  silkscreen extent -8.34,-10.11 7.11,10.36
PQFP-160_28x28mm_P0.65mm [mm]
  oval 1.75x0.4 smd: 1(-15.125,12.675) 2(-15.125,12.025) 3(-15.125,11.375) 4(-15.125,10.725) 5(-15.125,10.075) 6(-15.125,9.425) 7(-15.125,8.775) 8(-15.125,8.125) 9(-15.125,7.475) 10(-15.125,6.825) 11(-15.125,6.175) 12(-15.125,5.525) 13(-15.125,4.875) 14(-15.125,4.225) 15(-15.125,3.575) 16(-15.125,2.925) 17(-15.125,2.275) 18(-15.125,1.625) 19(-15.125,0.975) 20(-15.125,0.325) 21(-15.125,-0.325) 22(-15.125,-0.975) 23(-15.125,-1.625) 24(-15.125,-2.275) 25(-15.125,-2.925) 26(-15.125,-3.575) 27(-15.125,-4.225) 28(-15.125,-4.875) 29(-15.125,-5.525) 30(-15.125,-6.175) 31(-15.125,-6.825) 32(-15.125,-7.475) 33(-15.125,-8.125) 34(-15.125,-8.775) 35(-15.125,-9.425) 36(-15.125,-10.075) 37(-15.125,-10.725) 38(-15.125,-11.375) 39(-15.125,-12.025) 40(-15.125,-12.675) 81(15.125,-12.675) 82(15.125,-12.025) 83(15.125,-11.375) 84(15.125,-10.725) 85(15.125,-10.075) 86(15.125,-9.425) 87(15.125,-8.775) 88(15.125,-8.125) 89(15.125,-7.475) 90(15.125,-6.825) 91(15.125,-6.175) 92(15.125,-5.525) 93(15.125,-4.875) 94(15.125,-4.225) 95(15.125,-3.575) 96(15.125,-2.925) 97(15.125,-2.275) 98(15.125,-1.625) 99(15.125,-0.975) 100(15.125,-0.325) 101(15.125,0.325) 102(15.125,0.975) 103(15.125,1.625) 104(15.125,2.275) 105(15.125,2.925) 106(15.125,3.575) 107(15.125,4.225) 108(15.125,4.875) 109(15.125,5.525) 110(15.125,6.175) 111(15.125,6.825) 112(15.125,7.475) 113(15.125,8.125) 114(15.125,8.775) 115(15.125,9.425) 116(15.125,10.075) 117(15.125,10.725) 118(15.125,11.375) 119(15.125,12.025) 120(15.125,12.675)
  oval 0.4x1.75 smd: 41(-12.675,-15.125) 42(-12.025,-15.125) 43(-11.375,-15.125) 44(-10.725,-15.125) 45(-10.075,-15.125) 46(-9.425,-15.125) 47(-8.775,-15.125) 48(-8.125,-15.125) 49(-7.475,-15.125) 50(-6.825,-15.125) 51(-6.175,-15.125) 52(-5.525,-15.125) 53(-4.875,-15.125) 54(-4.225,-15.125) 55(-3.575,-15.125) 56(-2.925,-15.125) 57(-2.275,-15.125) 58(-1.625,-15.125) 59(-0.975,-15.125) 60(-0.325,-15.125) 61(0.325,-15.125) 62(0.975,-15.125) 63(1.625,-15.125) 64(2.275,-15.125) 65(2.925,-15.125) 66(3.575,-15.125) 67(4.225,-15.125) 68(4.875,-15.125) 69(5.525,-15.125) 70(6.175,-15.125) 71(6.825,-15.125) 72(7.475,-15.125) 73(8.125,-15.125) 74(8.775,-15.125) 75(9.425,-15.125) 76(10.075,-15.125) 77(10.725,-15.125) 78(11.375,-15.125) 79(12.025,-15.125) 80(12.675,-15.125) 121(12.675,15.125) 122(12.025,15.125) 123(11.375,15.125) 124(10.725,15.125) 125(10.075,15.125) 126(9.425,15.125) 127(8.775,15.125) 128(8.125,15.125) 129(7.475,15.125) 130(6.825,15.125) 131(6.175,15.125) 132(5.525,15.125) 133(4.875,15.125) 134(4.225,15.125) 135(3.575,15.125) 136(2.925,15.125) 137(2.275,15.125) 138(1.625,15.125) 139(0.975,15.125) 140(0.325,15.125) 141(-0.325,15.125) 142(-0.975,15.125) 143(-1.625,15.125) 144(-2.275,15.125) 145(-2.925,15.125) 146(-3.575,15.125) 147(-4.225,15.125) 148(-4.875,15.125) 149(-5.525,15.125) 150(-6.175,15.125) 151(-6.825,15.125) 152(-7.475,15.125) 153(-8.125,15.125) 154(-8.775,15.125) 155(-9.425,15.125) 156(-10.075,15.125) 157(-10.725,15.125) 158(-11.375,15.125) 159(-12.025,15.125) 160(-12.675,15.125)
  silkscreen extent -15.34,-14.11 14.11,14.11
R_1206_3216Metric_Pad1.30x1.75mm_HandSolder [mm]
  oval 1.3x1.75 smd: 1(-1.55,0) 2(1.55,0)
  silkscreen extent -0.73,-0.91 0.73,0.91
R_1210_3225Metric_Pad1.30x2.65mm_HandSolder [mm]
  oval 1.3x2.65 smd: 1(-1.55,0) 2(1.55,0)
  silkscreen extent -0.72,-1.36 0.72,1.35
R_1812_4532Metric_Pad1.30x3.40mm_HandSolder [mm]
  oval 1.3x3.4 smd: 1(-2.225,0) 2(2.225,0)
  silkscreen extent -1.39,-1.71 1.39,1.71
R_Array_SIP9 [mm]
  rect 1.6x1.6 hole 0.8: 1(0,0)
  round 1.6 hole 0.8: 2(2.54,0) 3(5.08,0) 4(7.62,0) 5(10.16,0) 6(12.7,0) 7(15.24,0) 8(17.78,0) 9(20.32,0)
  silkscreen extent -1.44,-1.4 21.76,1.4
sim72 [mil]
  rect 45x45 hole 25: 1(1875,-50)
  round 45 hole 25: 2(1825,50) 3(1775,-50) 4(1725,50) 5(1675,-50) 6(1625,50) 7(1575,-50) 8(1525,50) 9(1475,-50) 10(1425,50) 11(1375,-50) 12(1325,50) 13(1275,-50) 14(1225,50) 15(1175,-50) 16(1125,50) 17(1075,-50) 18(1025,50) 19(975,-50) 20(925,50) 21(875,-50) 22(825,50) 23(775,-50) 24(725,50) 25(675,-50) 26(625,50) 27(575,-50) 28(525,50) 29(475,-50) 30(425,50) 31(375,-50) 32(325,50) 33(275,-50) 34(225,50) 35(175,-50) 36(125,50) 37(-125,-50) 38(-175,50) 39(-225,-50) 40(-275,50) 41(-325,-50) 42(-375,50) 43(-425,-50) 44(-475,50) 45(-525,-50) 46(-575,50) 47(-625,-50) 48(-675,50) 49(-725,-50) 50(-775,50) 51(-825,-50) 52(-875,50) 53(-925,-50) 54(-975,50) 55(-1025,-50) 56(-1075,50) 57(-1125,-50) 58(-1175,50) 59(-1225,-50) 60(-1275,50) 61(-1325,-50) 62(-1375,50) 63(-1425,-50) 64(-1475,50) 65(-1525,-50) 66(-1575,50) 67(-1625,-50) 68(-1675,50) 69(-1725,-50) 70(-1775,50) 71(-1825,-50) 72(-1875,50) ""(0,0)
  round 118.11 hole 98.43: ""(-2200,0) ""(2200,0)
  silkscreen extent -2275,-125 2275,175
SOIC-20W_7.5x12.8mm_P1.27mm [mm]
  oval 2.05x0.6 smd: 1(-4.65,5.715) 2(-4.65,4.445) 3(-4.65,3.175) 4(-4.65,1.905) 5(-4.65,0.635) 6(-4.65,-0.635) 7(-4.65,-1.905) 8(-4.65,-3.175) 9(-4.65,-4.445) 10(-4.65,-5.715) 11(4.65,-5.715) 12(4.65,-4.445) 13(4.65,-3.175) 14(4.65,-1.905) 15(4.65,-0.635) 16(4.65,0.635) 17(4.65,1.905) 18(4.65,3.175) 19(4.65,4.445) 20(4.65,5.715)
  silkscreen extent -5.05,-6.51 3.86,6.75
SOIC-24W_7.5x15.4mm_P1.27mm [mm]
  oval 2.05x0.6 smd: 1(-4.65,6.985) 2(-4.65,5.715) 3(-4.65,4.445) 4(-4.65,3.175) 5(-4.65,1.905) 6(-4.65,0.635) 7(-4.65,-0.635) 8(-4.65,-1.905) 9(-4.65,-3.175) 10(-4.65,-4.445) 11(-4.65,-5.715) 12(-4.65,-6.985) 13(4.65,-6.985) 14(4.65,-5.715) 15(4.65,-4.445) 16(4.65,-3.175) 17(4.65,-1.905) 18(4.65,-0.635) 19(4.65,0.635) 20(4.65,1.905) 21(4.65,3.175) 22(4.65,4.445) 23(4.65,5.715) 24(4.65,6.985)
  silkscreen extent -5.05,-7.81 3.86,8.02
SOIC-28W_7.5x17.9mm_P1.27mm [mm]
  oval 2.05x0.6 smd: 1(-4.65,8.255) 2(-4.65,6.985) 3(-4.65,5.715) 4(-4.65,4.445) 5(-4.65,3.175) 6(-4.65,1.905) 7(-4.65,0.635) 8(-4.65,-0.635) 9(-4.65,-1.905) 10(-4.65,-3.175) 11(-4.65,-4.445) 12(-4.65,-5.715) 13(-4.65,-6.985) 14(-4.65,-8.255) 15(4.65,-8.255) 16(4.65,-6.985) 17(4.65,-5.715) 18(4.65,-4.445) 19(4.65,-3.175) 20(4.65,-1.905) 21(4.65,-0.635) 22(4.65,0.635) 23(4.65,1.905) 24(4.65,3.175) 25(4.65,4.445) 26(4.65,5.715) 27(4.65,6.985) 28(4.65,8.255)
  silkscreen extent -5.05,-9.06 3.86,9.29
SolderJumper-2_P1.3mm_Open_Pad1.0x1.5mm [mm]
  rect 1x1.5 smd paste-1.5: 1(-0.65,0) 2(0.65,0)
  silkscreen extent -1.4,-1 1.4,1
SOT23EBC [mil]
  rect 36x36 smd: 1(-35,40) 2(35,40) 3(0,-40)
  silkscreen extent -60,-15 60,15
SSOP-8_3.95x5.21x3.27mm_P1.27mm [mm]
  rect 1.45x0.8 smd: 1(-2.625,1.905) 2(-2.625,0.635) 3(-2.625,-0.635) 4(-2.625,-1.905) 5(2.625,-1.905) 6(2.625,-0.635) 7(2.625,0.635) 8(2.625,1.905)
  silkscreen extent -2.76,-2.74 2.1,2.9
subclick [mil]
  round 70 hole 40: 1(0,0)
  round 120 hole 60: 2(-100,100) 2(-100,-100) 2(100,100) 2(100,-100)
  silkscreen extent -200,-200 545,200
TQFP-100_14x14mm_P0.5mm [mm]
  oval 1.475x0.3 smd: 1(-7.662,6) 2(-7.662,5.5) 3(-7.662,5) 4(-7.662,4.5) 5(-7.662,4) 6(-7.662,3.5) 7(-7.662,3) 8(-7.662,2.5) 9(-7.662,2) 10(-7.662,1.5) 11(-7.662,1) 12(-7.662,0.5) 13(-7.662,0) 14(-7.662,-0.5) 15(-7.662,-1) 16(-7.662,-1.5) 17(-7.662,-2) 18(-7.662,-2.5) 19(-7.662,-3) 20(-7.662,-3.5) 21(-7.662,-4) 22(-7.662,-4.5) 23(-7.662,-5) 24(-7.662,-5.5) 25(-7.662,-6) 51(7.663,-6) 52(7.663,-5.5) 53(7.663,-5) 54(7.663,-4.5) 55(7.663,-4) 56(7.663,-3.5) 57(7.663,-3) 58(7.663,-2.5) 59(7.663,-2) 60(7.663,-1.5) 61(7.663,-1) 62(7.663,-0.5) 63(7.663,0) 64(7.663,0.5) 65(7.663,1) 66(7.663,1.5) 67(7.663,2) 68(7.663,2.5) 69(7.663,3) 70(7.663,3.5) 71(7.663,4) 72(7.663,4.5) 73(7.663,5) 74(7.663,5.5) 75(7.663,6)
  oval 0.3x1.475 smd: 26(-6,-7.662) 27(-5.5,-7.662) 28(-5,-7.662) 29(-4.5,-7.662) 30(-4,-7.662) 31(-3.5,-7.662) 32(-3,-7.662) 33(-2.5,-7.662) 34(-2,-7.662) 35(-1.5,-7.662) 36(-1,-7.662) 37(-0.5,-7.662) 38(0,-7.662) 39(0.5,-7.662) 40(1,-7.662) 41(1.5,-7.662) 42(2,-7.662) 43(2.5,-7.662) 44(3,-7.662) 45(3.5,-7.662) 46(4,-7.662) 47(4.5,-7.662) 48(5,-7.662) 49(5.5,-7.662) 50(6,-7.662) 76(6,7.662) 77(5.5,7.662) 78(5,7.662) 79(4.5,7.662) 80(4,7.662) 81(3.5,7.662) 82(3,7.662) 83(2.5,7.662) 84(2,7.662) 85(1.5,7.662) 86(1,7.662) 87(0.5,7.662) 88(0,7.662) 89(-0.5,7.662) 90(-1,7.662) 91(-1.5,7.662) 92(-2,7.662) 93(-2.5,7.662) 94(-3,7.662) 95(-3.5,7.662) 96(-4,7.662) 97(-4.5,7.662) 98(-5,7.662) 99(-5.5,7.662) 100(-6,7.662)
  silkscreen extent -8.04,-7.11 7.11,7.11

## Via types
v1: diameter 35, hole 15.75, top_copper to Bottom Layer, 807 vias
v2: diameter 31.5, hole 15.75, top_copper to Bottom Layer, 1 vias

## Nets (pads, with @x,y where several pads share a name; then routed paths per layer and width w, separated by ;. In a path a pad name is that pad's centre, name@x,y a point inside that pad or via, vN(x,y) a via of type N, cw(c..) or ccw(c..) an arc to the next point about the centre after c; other vN are vias at no path point)
+3.3V: BUS1.A21 BUS1.A27 BUS1.A33 BUS1.A39 BUS1.A45 BUS1.A53 BUS1.B25 BUS1.B31 BUS1.B36 BUS1.B41 BUS1.B43 BUS1.B54 C68.1 C69.1 | length 6589.6
  top_copper w9.06: v1(2790,450) 2815,450 2840,425 BUS1.B25@2840,185 BUS1.B25@2840,80 ; BUS1.B31@3140,80 BUS1.B31@3140,185 3140,325 3165,350 v1(3165,450) ; BUS1.B36@3390,80 BUS1.B36@3390,185 v1(3390,450) ; v1(3615,450) 3615,350 3640,325 BUS1.B41@3640,185 BUS1.B41@3640,80 ; v1(3690,450) 3715,450 3740,425 BUS1.B43@3740,185 BUS1.B43@3740,80 ; BUS1.B54@4290,80 BUS1.B54@4290,185 4290,325 4315,350 v1(4315,450)
  Mid-Layer 2 w9.06: v1(2640,450) v1(2790,450) v1(2940,450) v1(3165,450) v1(3240,450) v1(3390,450) v1(3540,450) v1(3615,450) v1(3690,450) v1(3840,450) v1(4240,450) v1(4315,450)
  Bottom Layer w9.06: C68.1@2600,580 2600,470 2620,450 v1(2640,450) ; v1@2630,450 2600,420 2600,365 2640,325 BUS1.A21@2640,185 BUS1.A21@2640,80 ; BUS1.A27@2940,80 BUS1.A27@2940,185 v1(2940,450) ; BUS1.A33@3240,80 BUS1.A33@3240,185 v1(3240,450) ; BUS1.A39@3540,80 BUS1.A39@3540,185 v1(3540,450) ; C69.1@3800,580 3800,490 v1(3840,450) 3830,450 3800,420 3800,365 3840,325 BUS1.A45@3840,185 BUS1.A45@3840,80 ; BUS1.A53@4240,80 BUS1.A53@4240,185 v1(4240,450)
+5F: C55.1 L3.2 Q1.3 Q2.3 Q3.3 | length 1728.7
  top_copper w9.06: v1(765,2340) 765,2315 770,2310 770,2215 770,2020 780,2010 855,2010 890,1975 890,1785 945,1730 v1(945,1410)
  Bottom Layer w9.06: v1(765,2340) 765,2380 805,2420 805,2530 815,2540 880,2540 880,2595 845,2630 Q3.3@845,2740 ; Q2.3@845,1410 v1(945,1410) Q1.3@1025,1410